# Altium PCB CLLC_PrimarySide_v12.PcbDoc (part 2 of 2)
Units mm, origin at the board's own origin, x right, y up, seen from the top; angles counter-clockwise.
Board outline 148.33 x 167.75 mm, 4 copper layers (GND, SIG, HVDC, GND/OUTPUT), stack 1.369 mm thick; 87 components, 34 nets, 218 pads, 476 vias.
Unrouted connection lines stored in the file: 15.
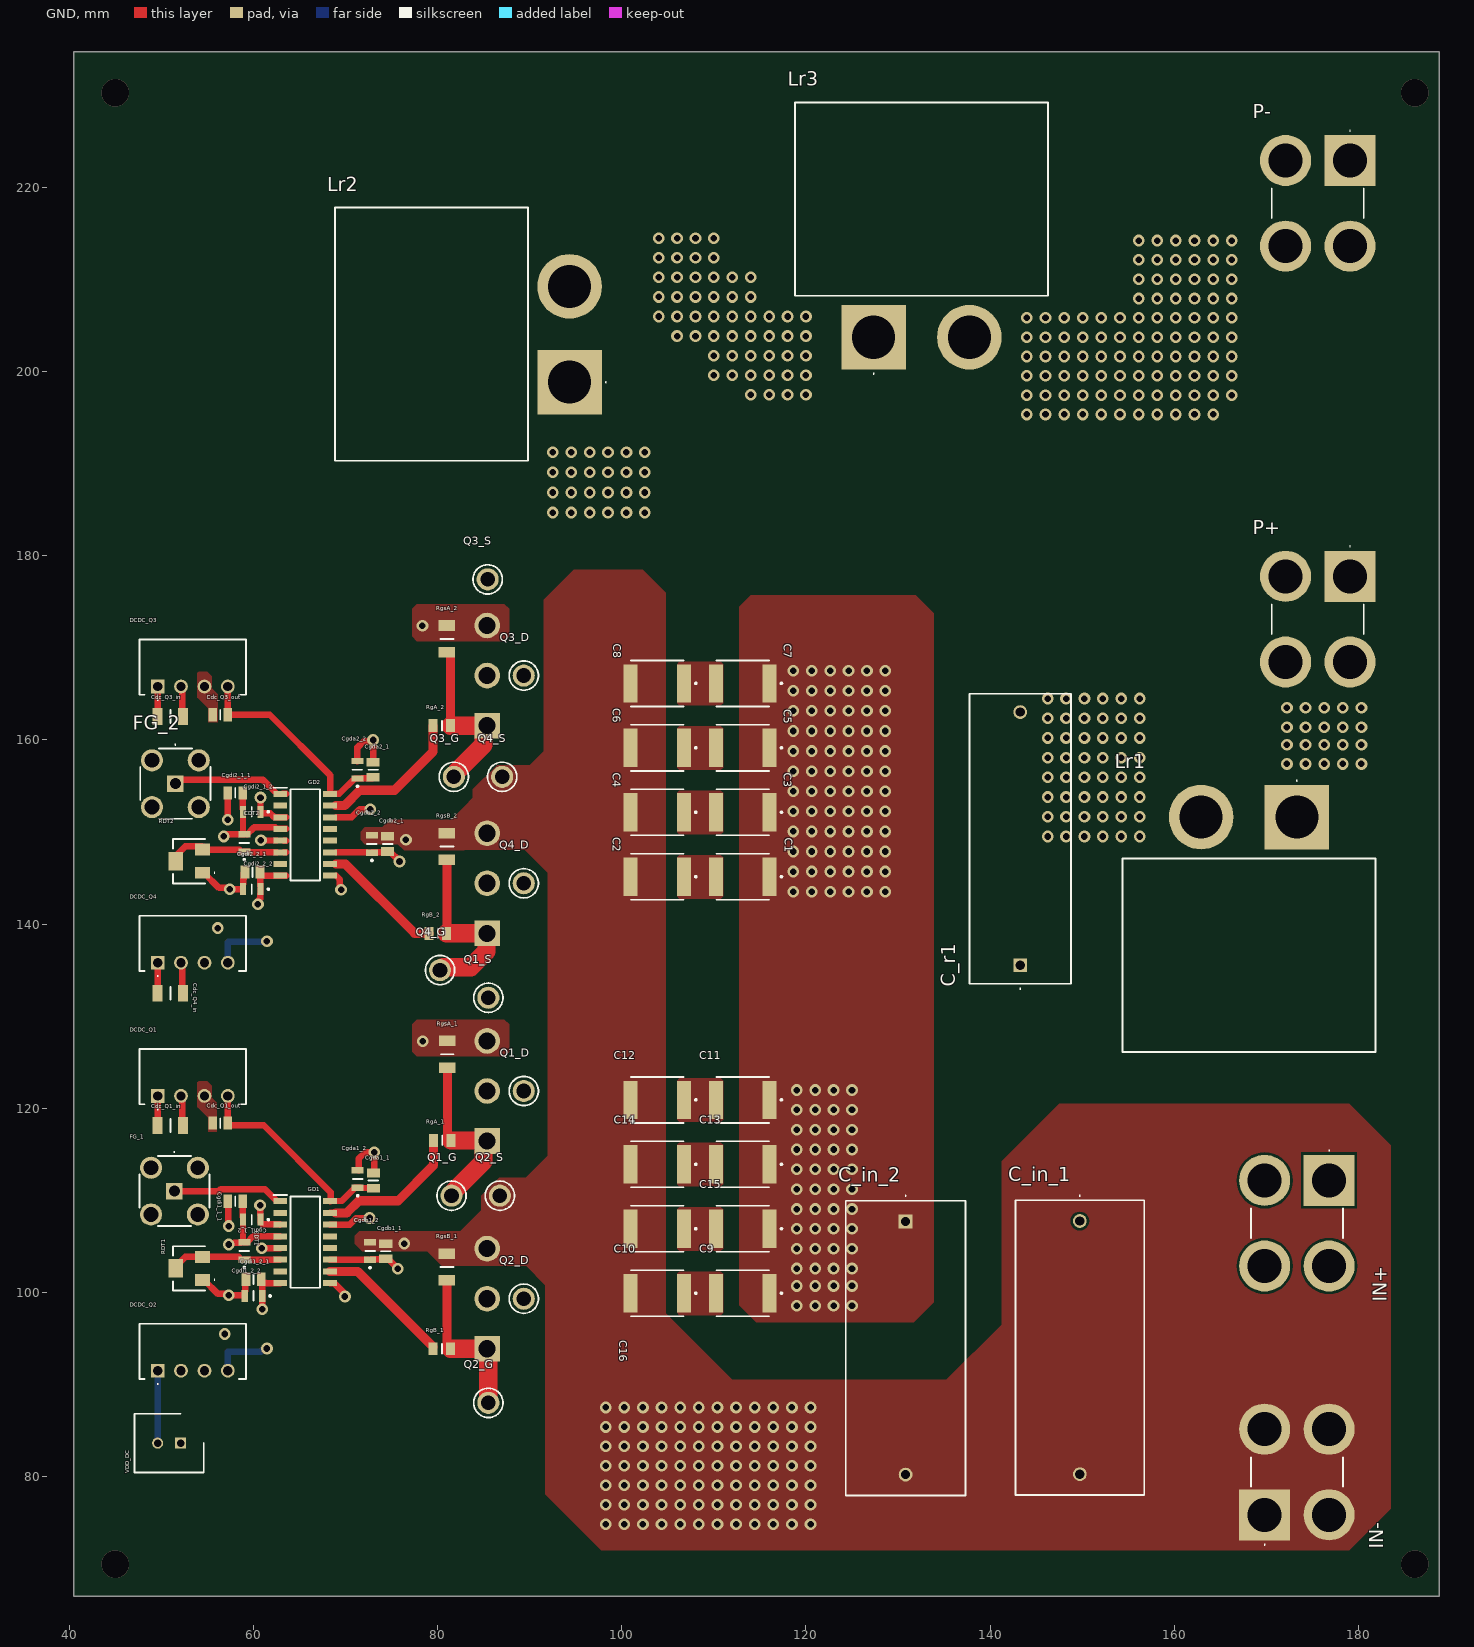
[diagram p0: GND view]

## Polygon pours and split planes (outlines as drawn) (continued)
NetC7_2 on GND "NETC7_2_L01_P155" (solid, pour order 155): 106,168.25 106.25,168.5 110.75,168.5 111,168.25 111,164 110.75,163.75 106.25,163.75 106,164
Q1_S on GND "Q1_S_L01_P130" (solid, pour order 130): 77.25,129.126 77.75,129.626 87.25,129.626 87.75,129.126 87.75,126.126 87.25,125.626 77.75,125.626 77.25,126.126
Q1_D on GND "Q1_D_L01_P102" (solid, pour order 102): 131.925,175.725 133.9,173.75 133.9,98.925 131.725,96.75 114.575,96.75 112.75,98.575 112.75,174.475 114,175.725
NetLr2_F1 on HVDC "NETLR2_F1_L03_P145" (solid, pour order 145): 92.75,216.25 89.75,213.25 89.75,207.75 92.25,205.25 102.772,205.25 113.022,194 130.75,194 130.975,194.225 130.975,208.25 118.25,208.25 114.5,212 110.25,216.25
NetLr3_F1 on HVDC "NETLR3_F1_L03_P152" (solid, pour order 152): 165,227.75 152.25,215 152.25,209.75 150.5,208 136.25,208 133.75,205.5 133.75,197.75 139.25,192.25 168.25,192.25 184.25,208.25 184.25,226 181.75,228.5 165.75,228.5
Q1_D on HVDC "HVDC-Q1_D" (solid, pour order 108): 107.75,116.7 111.7,112.75 112.025,112.425 112.025,99.1 114.625,96.5 180.5,96.5 183.475,99.475 183.475,115.7 178.8,120.375 136.375,120.375 133.9,122.85 133.9,173.75 131.9,175.75 113.975,175.75 112.025,173.8 112.025,173.525 109.25,170.75 87.75,170.75 84.375,167.375 84.375,166.625 88.6,162.4 109.6,162.4 112.025,160 112.025,129 108,125 87.75,125 84.375,121.625 89.3,116.7
Q3_S on HVDC "Q3_S_L03_P163" (solid, pour order 163): 100,178.25 91,178.25 90,179.25 90,202.25 91.5,203.75 101.25,203.75 105.25,199.75 105.25,183.5
NetLr1_S1 on HVDC "NETLR1_S1_L03_P151" (solid, pour order 151): 169.75,154 169.75,148.125 179.125,148.125 183,152 183,181.75 179.5,185.25 166.75,185.25 160,178.5 160,169.5 169.75,159.75
NetC_r1_2 on HVDC "NETC_R1_2_L03_P143" (solid, pour order 143): 142.25,166.75 142.603,167.103 156.897,167.103 166.95,157.05 166.95,149.65 164.525,147.225 143.525,147.225 138,152.75 138,162.5